# Altium PCB MOD_DRV.PcbDoc (part 2 of 2)
Units mm, origin at the board's own origin, x right, y up, seen from the top; angles counter-clockwise.
Board outline 63.5 x 51.43 mm, 2 copper layers (Top Layer, Bottom Layer); 88 components, 70 nets, 353 pads, 143 vias.
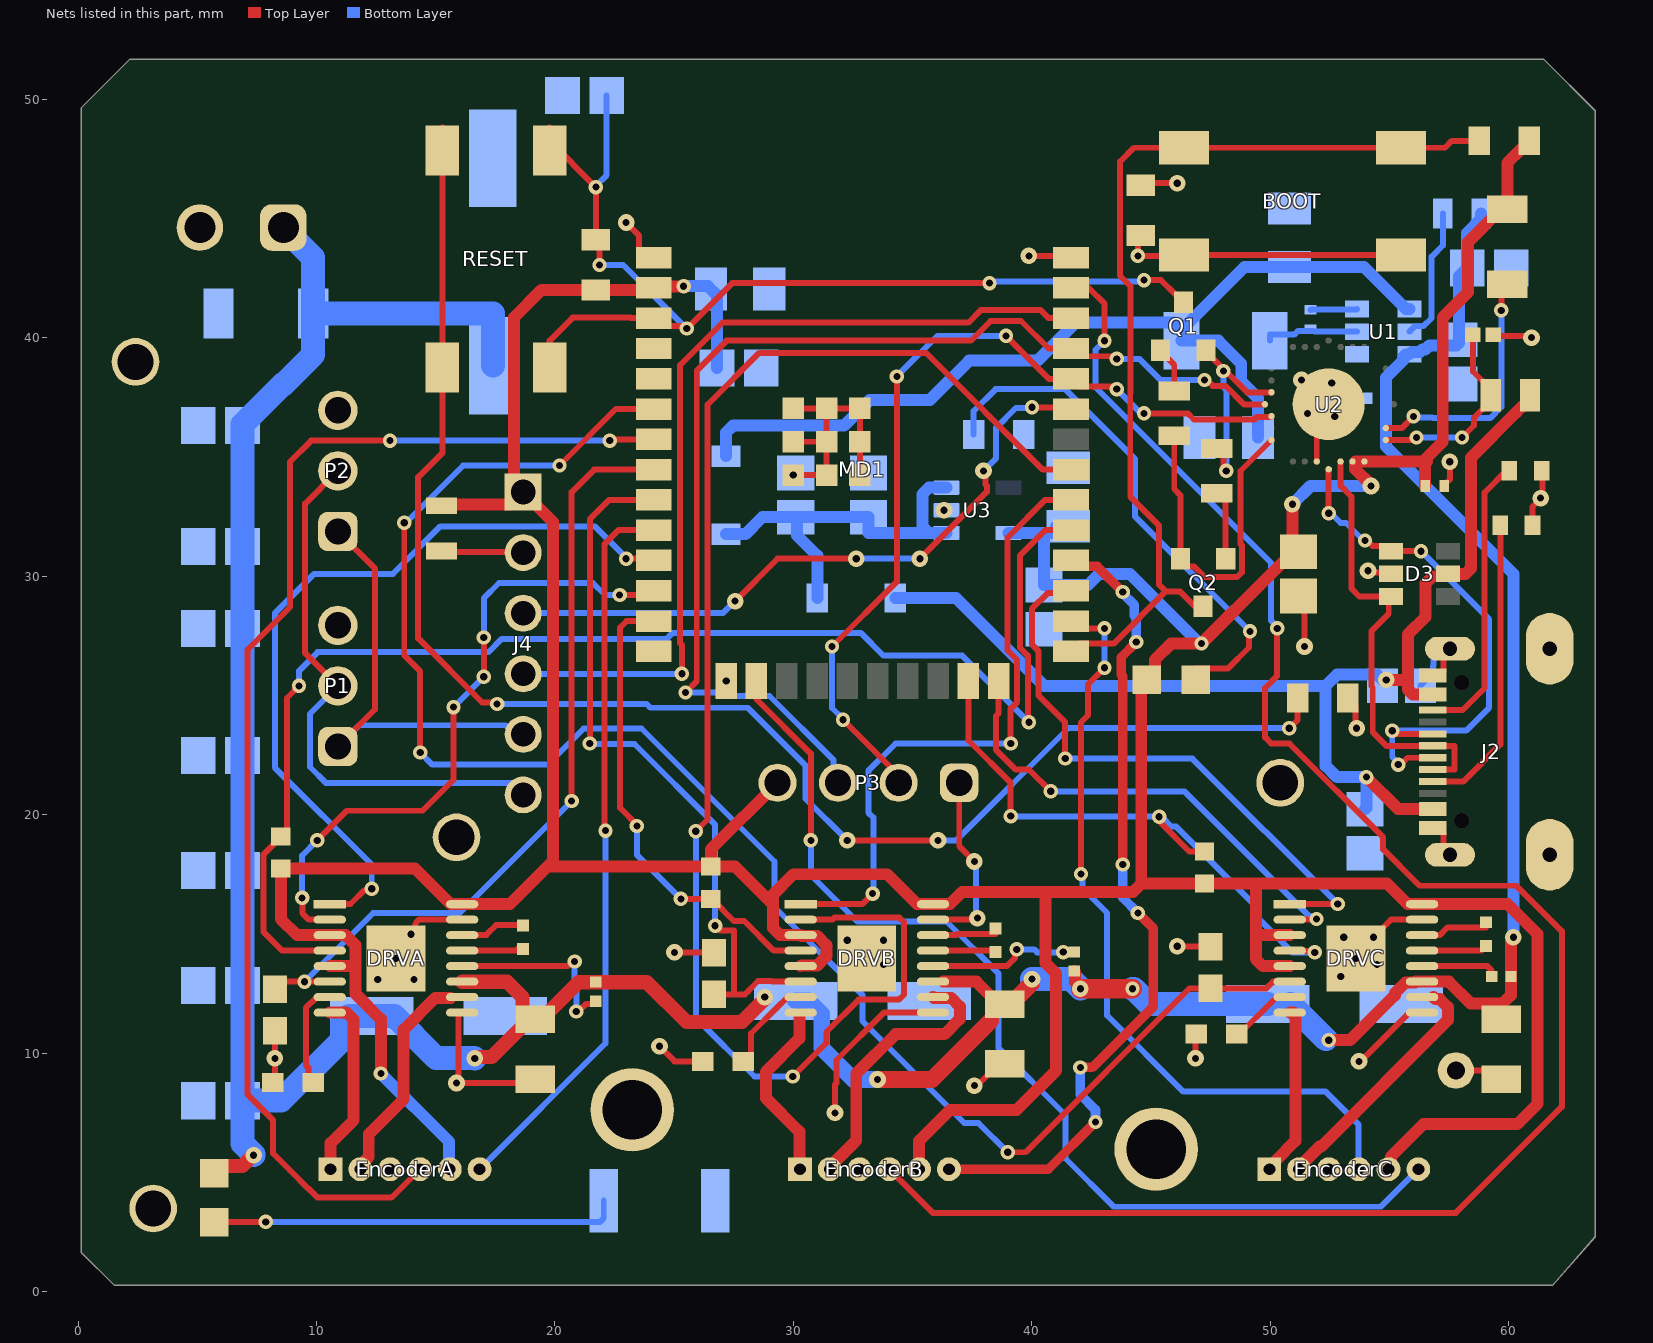
[diagram p2: the nets of this part, all layers, seen from the top]

## Part data (continued)
U2: library part CMP-08093-000007-1, "IC USB TO UART BRIDGE QFN28"
U3: library part CMP-04917-000028-1, "IC REG LINEAR 3.3V 1A SOT23-5", Dropout Voltage=1350mV, Manufacturer="Texas Instruments", Max Junction Temp=+125°C, Max Supply Voltage=5.5V, Min Supply Voltage=1.45V, Output Current=1A, Output Voltage=3.3V, Package=DBV0005A, Temperature="-40°C to +125°C", Temperature Range Low=-40°C, Accuracy Percentage=1%, Automotive=No, Category=IC, ComponentLink2Description=Datasheet, ComponentLink2URL=http://www.ti.com/lit/ds/symlink/tlv757p.pdf, Device Class L1="Integrated Circuits (ICs)", Device Class L2="Power Management ICs", Device Class L3="Voltage Regulators - Linear", Digikey Description="IC REG LINEAR 3.3V 1A SOT23-5", Height=1.45mm, Ipc Land Pattern Name=SOT95P280X145-5, Lead Free=Yes, Manufacturer Part Number=TLV75733PDBVR, Mouser Description="1-A low-IQ small-size low-dropout (LDO) regulator 5-SOT-23 -40 to 125", Number of Outputs=1, Octopart=https://octopart.com/tlv75733pdbvr-texas+instruments-91437073, Output Type=Fixed, RoHS=TRUE, Standoff Height=0mm, Temperature Range High=+125°C

## Free pads (board coordinates)
  round 1.524 hole 0.762: 3(57.785,9.271)
  round 2 hole 1.5: 4(2.413,38.989) 4(3.15,3.485) 4(15.875,19.05) 4(50.419,21.336)
  round 3.5 hole 2.5: 5(23.241,7.62) 5(45.212,5.969)

## Via types
v1: diameter 0.6, hole 0.3, Top Layer to Bottom Layer, tented both sides, 88 vias
v2: diameter 0.7, hole 0.3, Top Layer to Bottom Layer, tented both sides, 55 vias

## Nets (pads, with @x,y where several pads share a name; then routed paths per layer and width w, separated by ;. In a path a pad name is that pad's centre, name@x,y a point inside that pad or via, vN(x,y) a via of type N, cw(c..) or ccw(c..) an arc to the next point about the centre after c; other vN are vias at no path point)
3V3: C5.1 C6.1 C11.2 C19.1 C24.1 C25.2 C26.1 D2.1 DRVA.3 DRVA.5 DRVA.16 DRVB.3 DRVB.5 DRVB.16 DRVC.3 DRVC.5 DRVC.16 EncoderA.5 EncoderB.5 EncoderC.5 J4.1 MD1.2 P3.4 R3.1 R4A.1 R4B.1 R4C.1 R5.1 R8.2 U2.6 U2.7 U3.5 | length 218.3
  Top Layer w0.5: R4A.1@8.509,17.399 8.509,15.621 9.185,14.945 DRVA.3@10.56,14.945 11.224,14.945 11.637,14.531 11.637,13.675 ; R4A.1@8.509,17.449 R4A.1@8.509,17.74 14.137,17.74 15.632,16.245 DRVA.16@16.11,16.245 18.11,16.245 19.686,17.82 ; DRVA.5@10.56,13.645 11.608,13.645 11.637,13.675 ; v1(12.7,9.144) 12.7,11.424 11.637,12.487 11.637,13.675 ; C26.1@15.24,32.954 15.302,33.016 18.157,33.016 J4.1@18.669,33.528 ; v1(25.4,42.164) 25.381,42.145 24.198,42.145 MD1.2@24.143,42.09 24.056,42.003 R3.1@21.717,42.003 19.431,42.003 18.288,40.86 18.288,33.909 J4.1@18.669,33.528 ; P3.4@29.337,21.336 26.543,18.542 R4B.1@26.543,17.82 ; DRVB.5@30.308,13.645 30.338,13.675 31.002,13.675 31.386,14.059 31.386,14.531 31.002,14.915 30.338,14.915 DRVB.3@30.308,14.945 29.442,14.945 29.149,15.238 29.149,16.23 ; EncoderB.5@35.276,5.129 35.276,6.32 36.576,7.62 39.37,7.62 41.021,9.271 41.021,13.335 40.57,13.786 40.57,16.764 ; D2.1@44.592,25.605 44.592,17.105 ; D2.1@44.818,25.654 45.165,26.001 45.165,26.496 45.847,27.178 v1(47.117,27.178) 50.003,30.064 50.003,30.066 50.237,30.301 50.24,30.301 50.486,30.547 C11.2@51.466,30.547 ; DRVC.5@50.819,13.645 49.694,13.645 49.401,13.938 49.401,14.945 ; DRVC.3@50.819,14.945 49.401,14.945 ; v2(50.927,33.02) 50.927,31.279 C11.2@51.181,31.025 ; v2(54.229,33.782) 54.229,33.826 53.551,34.504 53.551,34.787 53.575,34.811 U2.7@53.951,34.811 56.582,34.811 ; EncoderC.5@54.961,5.129 55.057,5.225 55.057,5.654 56.421,7.018 60.358,7.018 61.214,7.874 61.214,14.986 59.955,16.245 DRVC.16@56.369,16.245 55.764,16.245 54.904,17.105 49.401,17.105 ; C25.2@56.496,33.782 56.496,34.725 56.582,34.811 ; R5.1@60.867,48.26 60.867,48.11 60.667,47.91 60.517,47.91 59.944,47.337 R8.2@59.944,45.39 59.669,45.39 58.293,44.014 58.293,41.91 57.234,40.851 57.234,35.632 56.582,34.98 56.582,34.811 ; J4.1@18.669,33.528 19.914,32.283 19.914,18.048 19.686,17.82 ; 19.686,17.82 19.914,17.82 R4B.1@26.543,17.82 ; R4B.1@26.543,17.82 27.559,17.82 29.149,16.23 ; 29.149,16.23 29.149,16.653 29.997,17.501 33.934,17.501 35.19,16.245 DRVB.16@35.859,16.245 36.565,16.245 37.084,16.764 40.57,16.764 ; 40.57,16.764 44.251,16.764 44.592,17.105 ; 44.592,17.105 R4C.1@47.244,17.105 49.401,17.105 ; 49.401,14.945 49.401,17.105
  Bottom Layer w0.5: v1(12.7,9.144) 15.561,6.283 15.561,5.159 EncoderA.5@15.591,5.129 ; v1(25.4,42.164) 26.416,42.164 26.797,41.783 C24.1@26.797,38.735 ; U3.5@39.019,31.816 40.513,31.816 ; C6.1@41.529,32.093 41.023,32.093 41.023,31.816 40.513,31.816 ; v1(47.117,27.178) 47.098,27.197 47.016,27.197 44.126,30.087 42.813,30.087 42.354,29.628 C19.1@40.513,29.628 40.513,31.816 ; v2(50.927,33.02) 51.689,33.782 v2(54.229,33.782)
5V_sys: C21.1 C22.1 D4.1 D6.1 U3.1 U3.3 | length 16.8
  Bottom Layer w0.5: D6.1@27.178,31.766 27.993,31.766 28.702,32.475 C22.1@30.099,32.475 C22.1@30.15,32.475 ; D4.1@31.004,29.083 31.004,30.861 30.15,31.715 C22.1@30.15,32.475 ; U3.1@36.419,31.816 35.687,31.816 ; U3.3@36.419,33.716 35.687,33.716 35.408,33.437 35.408,32.095 35.687,31.816 ; C22.1@30.15,32.475 C21.1@33.147,32.475 33.147,31.816 35.687,31.816
+5: C31.1 C32.1 D6.2 L1.2 U1.1 | length 39.8
  Bottom Layer w0.5: D6.2@27.178,35.036 27.178,36.029 27.471,36.322 32.131,36.322 33.198,37.389 35.724,37.389 37.375,39.04 40.238,39.04 41.839,40.64 45.971,40.64 46.283,40.328 48.926,42.971 C31.1@50.8,42.971 53.925,42.971 55.687,41.209 U1.1@55.837,41.209 ; L1.2@46.283,39.878 47.824,39.878 48.783,38.919 48.783,38.169 49.485,37.466 C32.1@49.485,35.814
CANH: J4.5 P1.1 P2.1 | length 18.6
  Top Layer w0.25: P1.1@10.898,22.86 12.446,24.408 12.446,30.329 P2.1@10.898,31.877
  Bottom Layer w0.25: P1.1@10.898,22.86 11.787,23.749 17.936,23.749 18.317,23.368 J4.5@18.669,23.368
CANL: J4.6 P1.2 P2.2 | length 23.5
  Top Layer w0.25: P1.2@10.898,25.4 9.525,26.773 9.525,33.044 P2.2@10.898,34.417
  Bottom Layer w0.25: P1.2@10.898,25.4 9.728,24.23 9.728,21.996 10.389,21.336 18.161,21.336 J4.6@18.669,20.828
D+: D3.1 J2.A6 J2.B6 U2.4 | length 23.5
  Top Layer w0.25: v1(52.451,32.639) U2.4@52.451,34.486 ; v1(53.975,31.496) 54.07,31.496 54.292,31.274 54.686,31.274 54.911,31.049 v1(56.327,31.049) ; v1(55.118,23.52) 55.251,23.387 J2.B6@56.814,23.387 ; v1(55.372,22.098) 55.467,22.098 55.756,22.387 J2.A6@56.814,22.387
  Bottom Layer w0.25: v1(52.451,32.639) 52.546,32.639 52.953,32.232 53.175,32.232 53.911,31.496 v1(53.975,31.496) ; v1@55.067,23.52 58.217,23.52 59.182,24.486 59.182,28.194 v1(56.327,31.049) ; v1(55.118,23.52) 55.118,22.419 55.372,22.165 v1(55.372,22.098)
D-: D3.3 J2.A7 J2.B7 U2.5 | length 18.9
  Top Layer w0.25: U2.5@52.951,34.811 52.951,33.79 53.4,33.341 53.4,29.489 53.74,29.149 D3.3@54.971,29.149 ; D3.3@55.061,29.149 D3.3@54.971,29.149 ; J2.B7@56.814,21.887 57.734,21.887 57.734,22.887 J2.A7@56.814,22.887 54.867,22.887 54.3,23.455 54.3,25.334 54.239,25.395 54.239,27.696 54.971,28.428 D3.3@54.971,29.149
DTR: Q2.2 R9.1 U2.28 | length 14.3
  Top Layer w0.25: R9.1@45.974,35.89 45.974,33.655 46.233,33.396 Q2.2@46.233,30.734 ; Q2.2@46.233,30.684 46.508,30.409 46.807,30.409 47.257,29.959 48.609,29.959 48.808,30.158 48.808,31.298 48.755,31.351 48.755,34.415 U2.28@50.051,35.711
EN: C13.1 MD1.3 Q1.3 R3.2 RESET.1 RESET.2 | length 45
  Top Layer w0.25: RESET.2@19.776,38.815 19.776,39.878 20.741,40.843 23.165,40.843 23.188,40.82 MD1.3@24.143,40.82 24.468,40.495 25.323,40.495 25.432,40.386 v1(25.527,40.386) 27.432,42.291 v1(38.227,42.291) ; RESET.1@19.776,48.815 19.776,48.26 v1(21.717,46.319) R3.2@21.717,44.103 21.869,44.103 v1(21.869,43.053) ; v1(44.704,42.418) 45.418,42.418 46.03,41.806 46.08,41.806 46.355,41.531 Q1.3@46.355,41.481
  Bottom Layer w0.25: v1(21.717,46.319) 21.717,46.364 22.172,46.819 C13.1@22.172,50.165 ; v1(21.869,43.053) 22.86,43.053 v1(25.527,40.386) ; v1(38.227,42.291) 38.291,42.355 44.64,42.355 v1(44.704,42.418)
GND: C1A.1 C1B.1 C1C.1 C2A.2 C2B.2 C2C.2 C5.2 C6.2 C7.2 C8.2 C9.1 C10.2 C11.1 C12.2 C13.2 C14.2 C15.2 C16.2 C17.2 C18.2 C19.2 C20.2 C21.2 C22.2 C24.2 C25.1 C26.2 C27.1 C30.2 C31.2 C32.2 D3.2 D5.2 DRVA.9 DRVA.15 DRVA.17 DRVB.9 DRVB.15 DRVB.17 DRVC.9 DRVC.15 DRVC.17 EncoderA.3 EncoderB.3 EncoderC.3 J1.2 J2.A1_B12 J2.B1_A12 J2.SH1 J2.SH2 J2.SH3 J2.SH4 J4.2 MD1.1 MD1.15 MD1.38 MD1.39 P1.3 P2.3 P3.1 pad.3 pad.4 pad.5 R1A.1 R1B.1 R1C.1 R2A.1 R2B.1 R2C.1 R6.2 R7.2 R11.1 R12.2 R14.1 R15.2 R16.2 U1.4 U2.3 U2.29 U3.2 | length 82.7
  Top Layer w0.25: R1A.1@7.874,11.245 8.255,10.864 v2(8.255,9.779) 8.255,8.851 R2A.1@8.167,8.763 ; v2(13.335,13.97) 13.802,15.058 DRVA.17@13.841,15.148 ; v2(13.97,14.986) 14.075,15.23 14.185,15.488 14.293,15.595 DRVA.15@16.11,15.595 ; C26.2@15.24,31.054 15.273,31.021 18.636,31.021 J4.2@18.669,30.988 ; v2(15.875,8.748) v2@15.875,8.89 ; v2@15.961,8.976 15.961,8.956 15.895,8.89 v2@15.875,8.89 ; v2@15.962,8.977 15.962,11.653 DRVA.9@16.004,11.695 ; C2A.2@19.177,8.909 19.016,8.748 16.017,8.748 v2@15.875,8.89 ; v2(22.987,44.831) 23.523,44.295 23.523,43.685 23.848,43.36 MD1.1@24.143,43.36 ; v2(24.384,10.287) 25.019,9.652 R2B.1@26.201,9.652 ; v2(25.019,14.224) 26.656,14.224 R1B.1@26.67,14.21 ; v2(29.993,34.24) MD1.39@31.393,34.24 MD1.39@31.393,35.64 ; MD1.39@29.993,35.64 MD1.39@31.393,35.64 ; MD1.39@29.993,37.04 MD1.39@31.393,37.04 ; v2(31.75,7.493) 31.75,8.676 31.809,8.736 31.809,9.711 33.793,11.695 DRVB.9@35.859,11.695 ; MD1.39@32.793,34.24 MD1.39@32.793,35.64 MD1.39@32.793,37.04 ; MD1.39@32.893,37.14 MD1.39@32.793,37.04 ; DRVB.15@35.859,15.595 35.876,15.612 37.67,15.612 v2(37.719,15.661) ; P3.1@36.957,21.336 36.957,18.669 v2(37.592,18.034) ; v2(37.592,8.636) 37.703,8.636 38.611,9.544 C2B.2@38.862,9.544 ; v2(39.878,43.434) 41.569,43.434 MD1.38@41.643,43.36 ; R7.2@44.577,46.389 44.67,46.482 v2(46.101,46.482) ; v2(46.101,14.478) 47.484,14.478 R1C.1@47.498,14.464 ; v2(46.863,9.779) 46.863,10.756 R2C.1@46.902,10.795 ; C11.1@51.181,29.173 51.435,28.919 v2(51.435,27.051) ; U2.3@51.951,34.811 51.951,36.611 52.451,37.111 U2.29@52.451,37.211 ; R6.2@53.247,24.892 53.572,24.567 53.572,23.675 v2(53.625,23.622) ; DRVC.17@53.594,14.125 v2(54.329,14.86) 55.064,15.595 DRVC.15@56.369,15.595 ; v2(53.721,9.652) 53.794,9.652 55.838,11.695 DRVC.9@56.369,11.695 ; v2(54.102,30.226) 54.165,30.162 54.998,30.162 D3.2@55.061,30.099 ; J2.A1_B12@56.814,19.437 57.089,19.437 57.264,19.262 57.264,18.592 J2.SH3@57.539,18.317 ; J2.B1_A12@56.814,25.837 57.089,25.837 57.264,26.012 57.264,26.682 J2.SH4@57.539,26.957 ; C25.1@57.296,33.782 57.296,33.832 57.371,33.907 57.385,33.907 57.531,34.053 v2(57.531,34.798) ; pad.3@57.785,9.271 59.671,9.271 C2C.2@59.69,9.29 ; R14.1@59.353,40.132 59.416,40.069 60.896,40.069 v2(60.96,40.005) ; R15.2@61.002,32.131 61.002,32.912 61.341,33.251 v2(61.341,33.274) 61.425,33.358 R16.2@61.425,34.417 ; MD1.39@31.393,35.64 MD1.39@31.393,37.04 ; MD1.39@31.393,37.04 MD1.39@32.793,37.04
  Bottom Layer w0.25: v2(37.592,18.034) 37.655,17.97 37.655,15.725 v2(37.719,15.661) ; C9.1@56.299,25.4 56.824,25.925 56.824,26.242 56.846,26.264 56.846,26.611 57.192,26.957 J2.SH4@57.539,26.957
  other v2: 12.573,13.081 14.097,13.081 52.959,13.208 33.782,13.716 54.483,13.716 53.594,13.97 32.258,14.732 33.782,14.732 53.086,14.859 27.183,25.6 36.322,32.766 52.705,36.703 51.562,36.83 52.578,38.1 51.308,38.227
IO0: BOOT.1 BOOT.2 MD1.25 Q2.3 R5.2 | length 40.3
  Top Layer w0.25: MD1.25@41.643,26.85 41.968,27.175 43.431,27.175 45.622,29.366 ; BOOT.1@45.546,47.97 44.282,47.97 43.702,47.39 43.702,42.607 44.136,42.173 44.136,37.679 44.129,37.672 44.129,33.336 45.329,32.136 45.329,29.658 45.622,29.366 ; BOOT.1@46.377,47.97 55.546,47.97 57.328,47.97 57.618,48.26 R5.2@58.767,48.26 ; Q2.3@47.183,28.734 46.838,28.734 46.206,29.366 45.622,29.366
IO2: DRVC.2 MD1.24 | length 20.5
  Top Layer w0.25: MD1.24@38.613,25.6 38.613,24.257 38.491,24.135 38.491,22.728 39.331,21.888 39.885,21.888 v1(40.792,20.98) ; DRVC.2@50.819,15.595 50.832,15.609 51.928,15.609 v1(51.941,15.622)
  Bottom Layer w0.25: v1(40.792,20.98) 46.397,20.98 51.621,15.756 51.712,15.756 51.847,15.622 v1(51.941,15.622)
IO4: EncoderC.4 MD1.26 | length 33
  Top Layer w0.25: MD1.26@41.643,28.12 41.95,27.813 v1(43.053,27.813) ; v1(42.062,17.514) 42.062,23.87 42.355,24.162 42.355,25.464 v1(43.053,26.162)
  Bottom Layer w0.25: v1(42.062,17.514) 42.129,17.447 42.129,16.907 43.155,15.882 43.155,11.582 46.355,8.382 52.324,8.382 53.711,6.995 EncoderC.4@53.711,5.129 ; v1(43.053,26.162) v1(43.053,27.813)
IO5: DRVA.4 MD1.29 R4A.2 | length 57.3
  Top Layer w0.25: v1(9.271,25.4) 8.763,24.892 8.763,19.316 8.537,19.09 8.481,19.09 8.228,18.837 8.228,18.781 7.772,18.325 7.772,15.088 8.565,14.295 DRVA.4@10.56,14.295 ; v1(39.878,23.876) 39.838,23.916 39.838,26.671 39.497,27.012 39.497,30.863 40.564,31.93 MD1.29@41.643,31.93
  Bottom Layer w0.25: v1(9.271,25.4) 9.271,26.035 10.049,26.813 17.212,26.813 17.774,27.375 24.692,27.375 24.943,27.626 32.826,27.626 33.782,26.67 37.084,26.67 v1(39.878,23.876)
IO12: MD1.14
IO13: EncoderC.6 MD1.16 | length 43.9
  Top Layer w0.25: MD1.16@28.453,25.6 28.453,24.841 30.734,22.56 v1(30.734,18.923)
  Bottom Layer w0.25: v1(30.734,18.923) 30.734,17.468 32.683,15.519 36.424,15.519 38.608,13.335 38.608,10.209 41.412,7.405 41.412,5.578 43.434,3.556 54.638,3.556 EncoderC.6@56.211,5.129
IO14: DRVB.4 MD1.13 R4B.2 | length 19.9
  Top Layer w0.25: v1(23.437,19.521) 23.437,19.575 22.733,20.279 22.733,27.847 23.006,28.12 MD1.13@24.143,28.12 ; v1(25.283,16.47) 26.571,16.47 27.503,15.538 27.941,15.538 29.185,14.295 DRVB.4@30.308,14.295
  Bottom Layer w0.25: v1(23.437,19.521) 23.437,18.316 v1(25.283,16.47)
IO15: DRVC.4 MD1.23 R4C.2 | length 25.4
  Top Layer w0.25: MD1.23@37.343,25.6 37.343,23.109 39.116,21.336 v1(39.116,19.939) ; v1(45.342,19.914) 45.409,19.847 45.409,19.655 46.609,18.455 R4C.2@47.244,18.455 ; DRVC.4@50.819,14.295 50.836,14.278 51.81,14.278 v1(51.864,14.224)
  Bottom Layer w0.25: v1(39.116,19.939) 39.129,19.926 45.424,19.926 45.851,19.499 46.059,19.499 49.539,16.019 49.539,15.612 50.927,14.224 v1(51.864,14.224)
IO16: DRVC.1 MD1.27 | length 24.8
  Top Layer w0.25: v1(41.402,22.352) 41.402,23.876 40.288,24.99 40.288,26.857 40.005,27.14 40.005,28.628 40.664,29.287 41.54,29.287 MD1.27@41.643,29.39 ; DRVC.1@50.819,16.245 50.824,16.25 52.826,16.25 v1(52.832,16.256)
  Bottom Layer w0.25: v1(41.402,22.352) 46.736,22.352 v1(52.832,16.256)
IO17: EncoderB.6 MD1.28 | length 34.8
  Top Layer w0.4: EncoderB.6@36.526,5.129 40.689,5.129 v1(42.672,7.112) ; MD1.28@41.643,30.66 41.893,30.41 42.742,30.41 v1(43.815,29.337) ; v1(42.037,9.398) 42.545,9.398 45.085,11.938 45.085,15.24 v1(44.45,15.875) ; v1(43.815,17.907) 43.815,25.81 43.753,25.872 43.753,26.602 44.384,27.233 v1(44.384,27.244)
  Bottom Layer w0.4: v1(42.037,9.398) 42.037,8.255 42.672,7.62 v1(42.672,7.112) ; v1(43.815,17.907) 43.815,16.513 44.45,15.878 v1(44.45,15.875) ; v1(43.815,29.337) 43.815,29.283 44.301,28.797 44.301,28.344 44.384,28.261 v1(44.384,27.244)
IO18: DRVB.1 MD1.30 | length 27.1
  Top Layer w0.25: DRVB.1@30.308,16.245 32.882,16.245 v1(33.325,16.688) ; v1(39.116,22.987) 39.116,24.443 39.388,24.715 39.388,26.485 38.989,26.884 38.989,31.625 40.564,33.2 MD1.30@41.643,33.2
  Bottom Layer w0.25: v1(33.325,16.688) 33.358,16.721 33.358,19.871 33.147,20.083 33.147,21.844 34.29,22.987 v1(39.116,22.987)
IO19: DRVB.2 MD1.31 | length 63
  Top Layer w0.25: v1(25.908,19.304) 26.399,19.795 26.399,37.194 28.574,39.37 35.565,39.37 40.465,34.47 MD1.31@41.643,34.47 ; v1(29.972,9.017) 31.388,10.433 31.388,10.89 32.737,12.239 34.427,12.239 34.639,12.45 34.639,15.49 34.448,15.68 31.719,15.68 31.634,15.595 DRVB.2@30.308,15.595
  Bottom Layer w0.25: v1(25.908,19.304) 25.908,11.481 28.372,9.017 v1(29.972,9.017)
IO21: J4.3 MD1.33 | length 28
  Top Layer w0.25: v2(27.559,28.956) 29.337,30.734 v2(32.639,30.734) ; v2(35.306,30.734) 38.112,33.54 38.112,33.79 38.059,33.843 38.059,34.331 v2(37.973,34.417) ; v1(40.005,37.084) 41.569,37.084 MD1.33@41.643,37.01
  Bottom Layer w0.25: J4.3@18.669,28.448 27.042,28.448 27.55,28.956 v2(27.559,28.956) ; v2(32.639,30.734) v2(35.306,30.734) ; v2(37.973,34.417) 38.507,34.951 38.507,36.229 39.33,37.052 39.973,37.052 v1(40.005,37.084)
IO22: J4.4 MD1.36 | length 37.1
  Top Layer w0.25: v1(25.324,25.908) 25.324,27.122 25.255,27.191 25.255,38.858 27.037,40.64 37.35,40.64 37.866,41.156 40.372,41.156 40.708,40.82 MD1.36@41.643,40.82
  Bottom Layer w0.25: J4.4@18.669,25.908 v1(25.324,25.908)
IO23: EncoderB.4 MD1.37 | length 77.7
  Top Layer w0.25: EncoderB.4@34.026,5.129 35.853,3.302 57.785,3.302 62.23,7.747 62.23,15.113 60.325,17.018 56.261,17.018 56.188,17.091 54.737,18.542 54.737,19.05 50.8,22.987 50.038,22.987 49.784,23.241 49.784,25.311 50.292,25.819 v1(50.292,27.813) ; MD1.37@41.643,42.09 42.395,42.09 43.053,41.432 v1(43.053,39.878)
  Bottom Layer w0.25: v1(43.053,39.878) 42.672,39.497 42.672,37.922 50.038,30.556 50.038,28.134 50.292,27.88 v1(50.292,27.813)
IO25: EncoderA.6 MD1.10 | length 30.7
  Top Layer w0.25: v1(22.123,19.329) 22.123,19.456 22.088,19.491 22.088,31.359 22.659,31.93 MD1.10@24.143,31.93
  Bottom Layer w0.25: EncoderA.6@16.841,5.129 22.123,10.411 v1(22.123,19.329)
IO26: DRVA.1 MD1.11 | length 33.3
  Top Layer w0.25: DRVA.1@10.56,16.245 10.569,16.254 11.428,16.254 11.998,16.824 12.252,16.824 v1(12.319,16.891) ; v1(22.987,30.734) 24.069,30.734 MD1.11@24.143,30.66
  Bottom Layer w0.25: v1(12.319,16.891) 12.319,17.907 8.255,21.971 8.255,28.448 9.906,30.099 13.208,30.099 15.197,32.088 18.669,32.088 21.675,32.088 22.987,30.776 v1(22.987,30.734)
IO27: DRVA.2 MD1.12 | length 27.2
  Top Layer w0.25: v1(9.398,16.51) 9.406,16.502 9.406,15.867 9.678,15.595 DRVA.2@10.56,15.595 ; v1(10.033,18.923) 11.274,20.164 14.449,20.164 15.747,21.462 v1(15.747,24.51) ; v1(17.018,25.781) v1(17.018,27.432) ; v1(22.713,29.21) 23.963,29.21 MD1.12@24.143,29.39
  Bottom Layer w0.25: v1(9.398,16.51) 9.398,18.288 v1(10.033,18.923) ; v1(15.747,24.51) v1(17.018,25.781) ; v1(17.018,27.432) 17.018,29.083 17.653,29.718 21.59,29.718 22.098,29.21 v1(22.713,29.21)
IO32: DRVA.6 MD1.8 R1A.2 | length 33.8
  Top Layer w0.25: R1A.2@7.874,13.067 7.946,12.995 v1(9.5,12.995) DRVA.6@10.56,12.995 ; v1(20.701,20.574) 20.701,33.528 21.643,34.47 MD1.8@24.143,34.47
  Bottom Layer w0.25: v1(9.5,12.995) 12.38,15.875 16.002,15.875 v1(20.701,20.574)
IO33: DRVB.6 MD1.9 R1B.2 | length 30.8
  Top Layer w0.25: v1(21.463,22.987) 21.463,32.385 22.278,33.2 MD1.9@24.143,33.2 ; R1B.2@26.67,12.46 27.508,12.46 ; v1(26.721,15.342) 26.924,15.138 27.508,15.138 27.508,12.46 ; DRVB.6@30.308,12.995 29.104,12.995 29.078,13.021 28.519,13.021 28.123,12.625 28.123,12.62 27.964,12.46 27.508,12.46
  Bottom Layer w0.25: v1(21.463,22.987) 21.488,22.962 23.336,22.962 26.721,19.577 v1(26.721,15.342)
IO34: DRVC.6 MD1.6 R1C.2 | length 71.7
  Top Layer w0.25: v1(13.682,32.245) 13.682,26.679 14.351,26.01 v1(14.351,22.606) ; v1(20.191,34.646) 22.555,37.01 MD1.6@24.143,37.01 ; v1(38.989,5.842) 39.745,5.842 46.617,12.714 R1C.2@47.498,12.714 49.833,12.714 50.114,12.995 DRVC.6@50.819,12.995
  Bottom Layer w0.25: v1(13.682,32.245) 13.754,32.245 16.154,34.646 v1(20.191,34.646) ; v1(14.351,22.606) 14.859,22.098 19.69,22.098 21.204,23.612 23.632,23.612 29.21,18.034 29.21,16.129 32.893,12.446 32.893,11.346 37.168,7.071 37.76,7.071 v1(38.989,5.842)
IO35: EncoderA.4 MD1.7 | length 53.3
  Top Layer w0.25: v1(13.081,35.687) 9.779,35.687 8.89,34.798 8.89,28.702 7.112,26.924 7.112,8.255 8.183,7.184 8.183,5.787 8.89,5.08 9.652,4.318 9.672,4.318 10.053,3.937 13.149,3.937 EncoderA.4@14.341,5.129 ; v1(22.301,35.687) 22.354,35.74 MD1.7@24.143,35.74
  Bottom Layer w0.25: v1(13.081,35.687) v1(22.301,35.687)
NetC3A_2: C3A.2 DRVA.12 | length 7.9
  Top Layer w0.25: DRVA.12@16.11,13.645 20.535,13.645 20.733,13.843 v1(20.828,13.843) ; v1(20.897,11.742) 20.992,11.742 21.319,12.068 21.617,12.068 C3A.2@21.719,12.171
  Bottom Layer w0.25: v1(20.828,13.843) 20.828,12.827 20.897,12.758 v1(20.897,11.742)
NetC3B_2: C3B.2 DRVB.12 | length 6.4
  Top Layer w0.25: DRVB.12@35.859,13.645 38.953,13.645 39.303,13.995 39.303,14.284 v1(39.37,14.351) ; v1(41.32,14.235) 41.772,14.235 C3B.2@41.783,14.245
  Bottom Layer w0.25: v1(39.37,14.351) 40.099,14.351 40.226,14.224 41.309,14.224 v1(41.32,14.235)
NetC3C_2: C3C.2 DRVC.12 | length 3
  Top Layer w0.25: DRVC.12@56.369,13.645 59.105,13.645 59.177,13.573 59.179,13.573 59.288,13.464 59.288,13.462
NetC4A_1: C4A.1 DRVA.14 | length 2.8
  Top Layer w0.25: DRVA.14@16.11,14.945 16.128,14.962 17.126,14.962 17.531,15.367 18.544,15.367 18.669,15.242 C4A.1@18.669,15.236
NetC4A_2: C4A.2 DRVA.13 | length 2.6
  Top Layer w0.25: DRVA.13@16.11,14.295 18.36,14.295 18.451,14.386 18.544,14.386 C4A.2@18.669,14.359
NetC4B_1: C4B.1 DRVB.14 | length 2.6
  Top Layer w0.25: DRVB.14@35.859,14.945 36.814,14.945 36.856,14.986 C4B.1@38.481,14.986
NetC4B_2: C4B.2 DRVB.13 | length 2.6
  Top Layer w0.25: DRVB.13@35.859,14.295 C4B.2@38.481,14.295
NetC4C_1: C4C.1 DRVC.14 | length 2.8
  Top Layer w0.25: DRVC.14@56.369,14.945 57.109,14.945 57.429,15.265 C4C.1@59.055,15.265
NetC4C_2: C4C.2 DRVC.13 | length 2.8
  Top Layer w0.25: DRVC.13@56.369,14.295 58.852,14.295 C4C.2@59.049,14.492
NetC23_1: C23.1 U1.6 | length 2
  Bottom Layer w0.25: C23.1@51.689,41.167 51.71,41.188 53.616,41.188 U1.6@53.637,41.209
NetC23_2: C23.2 L1.1 U1.5 | length 4
  Bottom Layer w0.25: L1.1@49.983,39.878 49.983,40.132 51.003,40.132 51.163,40.292 51.814,40.292 51.847,40.259 U1.5@53.637,40.259
NetD1_2: D1.2 R11.2 | length 17.1
  Top Layer w0.25: D1.2@5.715,2.908 5.728,2.921 v1(7.874,2.921)
  Bottom Layer w0.25: v1(7.874,2.921) 21.895,2.921 22.049,3.075 R11.2@22.049,3.81
NetD2_2: D2.2 R12.1 | length 21.9
  Top Layer w0.25: D2.2@46.85,26.137 48.235,26.137 49.109,27.011 49.109,27.646 v1(49.149,27.686)
  Bottom Layer w0.25: R12.1@37.558,35.941 37.558,36.923 38.481,37.846 41.402,37.846 44.323,34.925 44.323,32.512 v1(49.149,27.686)
NetDRVA_7: DRVA.7 R2A.2 | length 4.5
  Top Layer w0.25: R2A.2@9.867,8.763 9.658,8.972 9.658,9.392 9.557,9.493 9.557,11.9 9.984,12.328 10.542,12.328 DRVA.7@10.56,12.345
NetDRVA_8: DRVA.8 EncoderA.1 | length 7.8
  Top Layer w0.5: DRVA.8@10.56,11.695 11.264,11.695 11.557,11.402 11.557,7.188 10.591,6.222 EncoderA.1@10.591,5.129
NetDRVA_10: DRVA.10 EncoderA.2 | length 9.1
  Top Layer w0.5: EncoderA.2@11.841,5.129 11.841,5.291 12.192,5.642 12.192,6.604 13.654,8.066 13.654,10.987 14.982,12.315 DRVA.10@15.633,12.315
NetDRVB_7: DRVB.7 R2B.2 | length 4
  Top Layer w0.25: R2B.2@27.901,9.652 27.951,9.652 28.226,9.927 28.226,10.819 29.305,11.898 29.305,11.9 29.733,12.328 30.291,12.328 DRVB.7@30.308,12.345
NetDRVB_8: DRVB.8 EncoderB.1 | length 7.7
  Top Layer w0.5: DRVB.8@30.251,11.615 30.251,10.615 28.851,9.215 28.851,8.106 30.251,6.706 30.251,5.154 EncoderB.1@30.276,5.129
NetDRVB_10: DRVB.10 EncoderB.2 | length 11.6
  Top Layer w0.5: EncoderB.2@31.526,5.129 31.526,5.223 32.639,6.336 32.639,9.144 34.29,10.795 36.344,10.795 36.987,11.438 36.987,11.952 36.623,12.315 35.889,12.315 DRVB.10@35.859,12.345
NetDRVC_7: DRVC.7 R2C.2 | length 3
  Top Layer w0.25: R2C.2@48.546,10.63 50.243,12.328 50.801,12.328 DRVC.7@50.819,12.345
NetDRVC_8: DRVC.8 EncoderC.1 | length 7.2
  Top Layer w0.5: EncoderC.1@49.961,5.129 50.211,5.379 50.211,5.472 51.054,6.316 51.054,11.615 50.974,11.695 DRVC.8@50.819,11.695
NetDRVC_10: DRVC.10 EncoderC.2 | length 10.2
  Top Layer w0.5: EncoderC.2@51.211,5.129 51.211,5.223 52.068,6.079 52.138,6.079 57.447,11.388 57.447,11.931 57.113,12.265 56.927,12.265 DRVC.10@56.847,12.345
NetJ2_A5: J2.A5 R15.1 | length 12.7
  Top Layer w0.25: J2.A5@56.814,21.387 58.09,21.387 59.648,22.945 R15.1@59.648,32.131
NetJ2_B5: J2.B5 R16.1 | length 12.1
  Top Layer w0.25: J2.B5@56.814,24.387 58.067,24.387 58.994,25.314 58.994,33.509 R16.1@59.966,34.48
NetQ1_1: Q1.1 R9.2 | length 1.9
  Top Layer w0.25: Q1.1@45.405,39.481 45.405,39.431 45.974,38.862 R9.2@45.974,37.77
NetQ2_1: Q2.1 R10.2 | length 3.1
  Top Layer w0.25: R10.2@47.752,33.477 48.133,33.477 Q2.1@48.133,30.734
NetR6_1: R6.1 RESET.3 RESET.4 | length 66.1
  Top Layer w0.25: RESET.3@15.276,48.815 15.276,35.164 14.265,34.153 14.265,27.391 16.951,24.705 17.51,24.705 v1(17.577,24.638) ; v2(32.258,18.923) v2(36.068,18.923) ; v1(50.8,23.622) 51.147,23.969 R6.1@51.147,24.892
  Bottom Layer w0.25: v1(17.577,24.638) 23.851,24.638 24.006,24.483 28.095,24.483 30.505,22.073 30.505,20.676 v2(32.258,18.923) ; v2(36.068,18.923) 36.83,18.923 41.539,23.632 50.79,23.632 v1(50.8,23.622)
NetR7_1: BOOT.3 BOOT.4 R7.1 | length 11.7
  Top Layer w0.25: R7.1@44.427,44.289 44.45,44.266 v1(44.45,43.434) 46.341,43.434 BOOT.3@46.377,43.47 ; BOOT.3@46.66,43.47 BOOT.4@55.546,43.47
NetR8_1: R8.1 U2.9 | length 10.7
  Top Layer w0.25: U2.9@54.851,36.211 55.515,36.211 v1(56.007,36.703) ; v1(59.69,41.148) 59.69,42.229 59.701,42.24 R8.1@59.944,42.24
  Bottom Layer w0.25: v1(56.007,36.703) 56.062,36.648 56.807,36.648 56.825,36.63 59.221,36.63 59.69,37.099 v1(59.69,41.148)
NetR13_1: R13.1 R14.2 U2.8 | length 8.4
  Top Layer w0.25: U2.8@54.851,35.711 56.031,35.711 v1(56.134,35.814) ; v1(58.039,35.814) 58.548,36.323 58.548,36.644 59.245,37.342 R13.1@59.245,37.592 59.245,37.842 58.503,38.585 R14.2@58.503,40.132
  Bottom Layer w0.25: v1(56.134,35.814) v1(58.039,35.814)
NetR17_1: R17.1 U1.2 | length 5.7
  Bottom Layer w0.25: U1.2@55.837,40.259 56.062,40.484 56.421,40.484 56.769,40.832 56.769,43.404 57.237,43.872 R17.1@57.237,45.212
RTS: Q1.2 R10.1 U2.24 | length 9
  Top Layer w0.25: Q1.2@47.305,39.481 47.305,39.431 47.966,38.77 47.966,38.675 v1(48.033,38.608) ; R10.1@47.752,35.357 48.031,35.357 v1@48.031,34.417 ; v1@48.08,38.656 48.128,38.608 48.134,38.608 49.031,37.711 U2.24@50.051,37.711
  Bottom Layer w0.25: v1(48.033,38.608) 48.033,37.933 48.158,37.808 v1(48.158,34.417)
"SENSOR VN": MD1.5
"SENSOR VP": MD1.4
U0RX: MD1.34 P3.2 U2.26 | length 37.2
  Top Layer w0.25: v1(31.623,27.051) 34.341,29.769 v1(34.341,38.379) ; v1(32.08,23.978) 34.417,21.641 P3.2@34.417,21.336 ; v1(38.915,40.081) 40.716,38.28 MD1.34@41.643,38.28 41.968,37.955 43.357,37.955 43.466,37.846 v1(43.561,37.846) ; v1(44.704,36.83) 46.548,36.83 46.784,36.594 ; 46.802,36.576 49.331,36.576 49.441,36.686 50.021,36.686 50.046,36.711 U2.26@50.051,36.711
  Bottom Layer w0.25: v1(31.623,27.051) 31.623,24.475 32.08,24.018 v1(32.08,23.978) ; v1(34.341,38.379) 36.043,40.081 v1(38.915,40.081) ; v1(43.561,37.846) 44.51,36.897 44.637,36.897 v1(44.704,36.83)
U0TX: MD1.35 P3.3 U2.25 | length 48.3
  Top Layer w0.25: v1(25.476,25.121) 25.949,25.593 25.949,38.623 27.203,39.878 37.45,39.878 38.278,40.706 39.548,40.706 40.704,39.55 MD1.35@41.643,39.55 41.968,39.225 43.357,39.225 43.466,39.116 v1(43.561,39.116) ; v1(47.245,38.225) 47.34,38.225 47.582,37.983 48.123,37.983 48.895,37.211 U2.25@49.776,37.211
  Bottom Layer w0.25: v1(25.476,25.121) 26.778,25.121 26.924,24.975 29,24.975 31.677,22.298 31.677,21.536 P3.3@31.877,21.336 ; v1(43.561,39.116) 44.513,39.116 45.404,38.225 v1(47.245,38.225)
V_MOT: C1A.2 C1B.2 C1C.2 C2A.1 C2B.1 C2C.1 C3A.1 C3B.1 C3C.1 C7.1 C8.1 C12.1 C14.1 C15.1 C16.1 C17.1 C18.1 C20.1 C27.2 C30.1 D1.1 D5.1 DRVA.11 DRVB.11 DRVC.11 J1.1 R17.2 U1.3 | length 161.9
  Top Layer w0.5: DRVB.11@36.287,12.995 37.678,12.995 38.283,12.39 38.283,12.374 C2B.1@38.611,12.046 ; 38.283,11.359 38.283,11.719 C2B.1@38.611,12.046 ; C2B.1@39.113,12.046 C2B.1@38.862,12.046 ; v2@39.967,12.9 39.967,13.063 v2(40.005,13.101) ; C3B.1@41.783,13.441 41.785,13.441 41.819,13.407 41.819,12.972 42.037,12.754 v2(42.037,12.7) ; v1(52.451,10.541) 53.346,10.541 55.224,12.419 55.224,12.514 55.676,12.965 56.071,12.965 56.1,12.995 DRVC.11@56.369,12.995 57.49,12.995 58.404,12.081 59.655,12.081 59.69,12.046 ; 59.714,12.046 60.092,12.424 C3C.1@60.092,13.208 60.092,14.672 60.198,14.778 v2(60.198,14.859) ; C2B.1@38.611,12.046 C2B.1@38.862,12.046 ; C2B.1@38.611,12.046 C2B.1@38.862,12.046
  Top Layer w0.6: D1.1@5.715,4.966 6.012,5.263 6.887,5.263 7.339,5.715 v2(7.366,5.715) ; DRVA.11@16.11,12.995 17.993,12.995 18.643,12.345 18.643,11.739 18.971,11.411 C2A.1@19.177,11.411 ; v2(16.637,9.779) 16.694,9.836 17.351,9.836 18.926,11.411 C2A.1@19.177,11.411 ; v2(28.798,12.346) 28.798,12.265 27.837,11.303 25.527,11.303 23.855,12.975 C3A.1@21.717,12.975 20.992,12.975 19.428,11.411 C2A.1@19.177,11.411
  Top Layer w0.7: v2(33.528,8.89) 35.814,8.89 38.283,11.359 ; C2B.1@39.113,12.046 v2@39.967,12.9
  Top Layer w0.8: v2(42.037,12.7) v1(44.223,12.7)
  Bottom Layer w0.4: C1A.2@49.899,12.065 C1A.2@50.849,12.065 ; v1@52.335,10.579 52.413,10.579 v1(52.451,10.541)
  Bottom Layer w0.5: U1.3@55.687,39.309 55.587,39.209 55.587,39.059 54.864,38.336 54.864,35.433 60.198,30.099 v2(60.198,14.859) ; U1.3@55.837,39.309 55.937,39.409 56.279,39.409 56.379,39.509 56.502,39.509 56.677,39.684 57.808,39.684 57.912,39.788 C7.1@57.912,39.915 57.912,42.582 C8.1@58.256,42.926 58.256,44.4 58.841,44.985 R17.2@58.841,45.212
  Bottom Layer w0.7: C1B.2@30.093,12.192 30.641,12.192 31.191,11.642 31.191,10.211 32.512,8.89 v2(33.528,8.89)
  Bottom Layer w1: C12.1@6.895,36.322 C14.1@6.895,31.242 C15.1@6.895,27.813 C16.1@6.895,22.479 C17.1@6.895,17.653 C18.1@6.895,12.827 C20.1@6.895,8.001 ; C12.1@6.895,36.373 8.565,38.043 8.616,38.043 9.859,39.286 D5.1@9.859,41.021 ; v2(7.366,5.715) 7.366,5.742 6.895,6.213 C20.1@6.895,8.001 ; J1.1@8.608,44.623 9.859,43.372 D5.1@9.859,41.021 ; v2(16.637,9.779) 16.618,9.798 15.022,9.798 13.263,11.557 C1C.2@12.313,11.557 11.363,11.557 11.063,11.257 11.063,10.555 8.515,8.007 6.901,8.007 C20.1@6.895,8.001 ; C27.2@17.399,38.83 17.399,41.021 D5.1@9.859,41.021 ; v2(40.005,13.101) 41.636,13.101 v2(42.037,12.7) ; v1(44.223,12.7) 44.274,12.7 44.909,12.065 C1A.2@49.899,12.065 ; C1A.2@50.849,12.065 v1@52.335,10.579
VBUS: C9.2 C10.1 D3.5 D4.2 J2.A4_B9 J2.B4_A9 R13.2 | length 49.2
  Top Layer w0.5: v1(54.032,21.572) 55.367,20.237 J2.A4_B9@56.814,20.237 ; v2(54.864,25.654) 55.778,25.654 ; J2.B4_A9@56.814,25.037 55.989,25.037 55.778,25.248 55.778,25.654 ; R13.2@60.833,37.338 60.833,37.278 60.719,37.164 60.618,37.164 60.325,36.871 60.325,36.868 58.419,34.962 58.419,30.327 58.191,30.099 D3.5@57.461,30.099 57.361,29.999 56.808,29.999 56.515,29.706 56.515,28.296 55.778,27.559 55.778,25.654
  Bottom Layer w0.5: D4.2@34.274,29.083 36.83,29.083 40.513,25.4 52.324,25.4 ; C10.1@53.975,20.23 54.032,20.286 v1(54.032,21.572) 52.799,21.572 52.324,22.047 52.324,25.4 ; C9.2@54.699,25.654 54.478,25.875 52.799,25.875 52.324,25.4
pads on no net: D3.4 D3.6 J2. J2.A8 J2.B8 MD1.17 MD1.18 MD1.19 MD1.20 MD1.21 MD1.22 MD1.32 U2.1 U2.2 U2.10 U2.11 U2.12 U2.13 U2.14 U2.15 U2.16 U2.17 U2.18 U2.19 U2.20 U2.21 U2.22 U2.23 U2.27 U3.4

## Polygon pours and split planes (outlines as drawn)
no net on Mechanical 1 "NONET_L-01_P-001" (none): 1.524,0.254 0.127,1.651 0.127,49.632 2.184,51.689 61.457,51.689 63.627,49.519 63.627,2.301 61.834,0.254
GND on Bottom Layer "NONET_L-01_P-001" (solid, pour order 3): 2.286,1.143 0.889,2.54 0.889,49.784 2.286,51.181 59.944,51.181 62.992,48.133 62.992,3.573 60.864,1.143

## Silkscreen, mask and mechanical layers (free items; w line width, h text height)
Top Overlay:
  text "ALFRED ERAZO" at 2.132,49.122 h1
  text "C2" at 53.467,6.731 h1
  text "C1" at 56.007,6.731 h1
  text "+" at 54.991,6.619 h1
  text "C2" at 13.97,6.604 h1
  text "C1" at 16.51,6.604 h1
  text "C2" at 33.655,6.604 h1
  text "C1" at 36.195,6.604 h1
  text "-" at 52.451,6.565 h1.52
  text "+" at 15.494,6.492 h1
  text "+" at 35.179,6.492 h1
  text "-" at 12.954,6.438 h1.52
  text "-" at 32.639,6.438 h1.52
Bottom Overlay:
  drawing of 9 lines, arcs and shapes, not listed

## Text inside footprints (layer, text, board x,y; h text height)
J2: Top 3D Body "PCB edge" at 63.969,27.887 h0.8 r90